# Altium PCB Motherboard.PcbDoc
Units mil, origin at the board's own origin, x right, y up, seen from the top; angles counter-clockwise.
Board outline 6000 x 4000 mil, 2 copper layers (Top Layer, Bottom Layer); 17 components, 24 nets, 94 pads, 0 vias.
Unrouted connection lines stored in the file: 45.
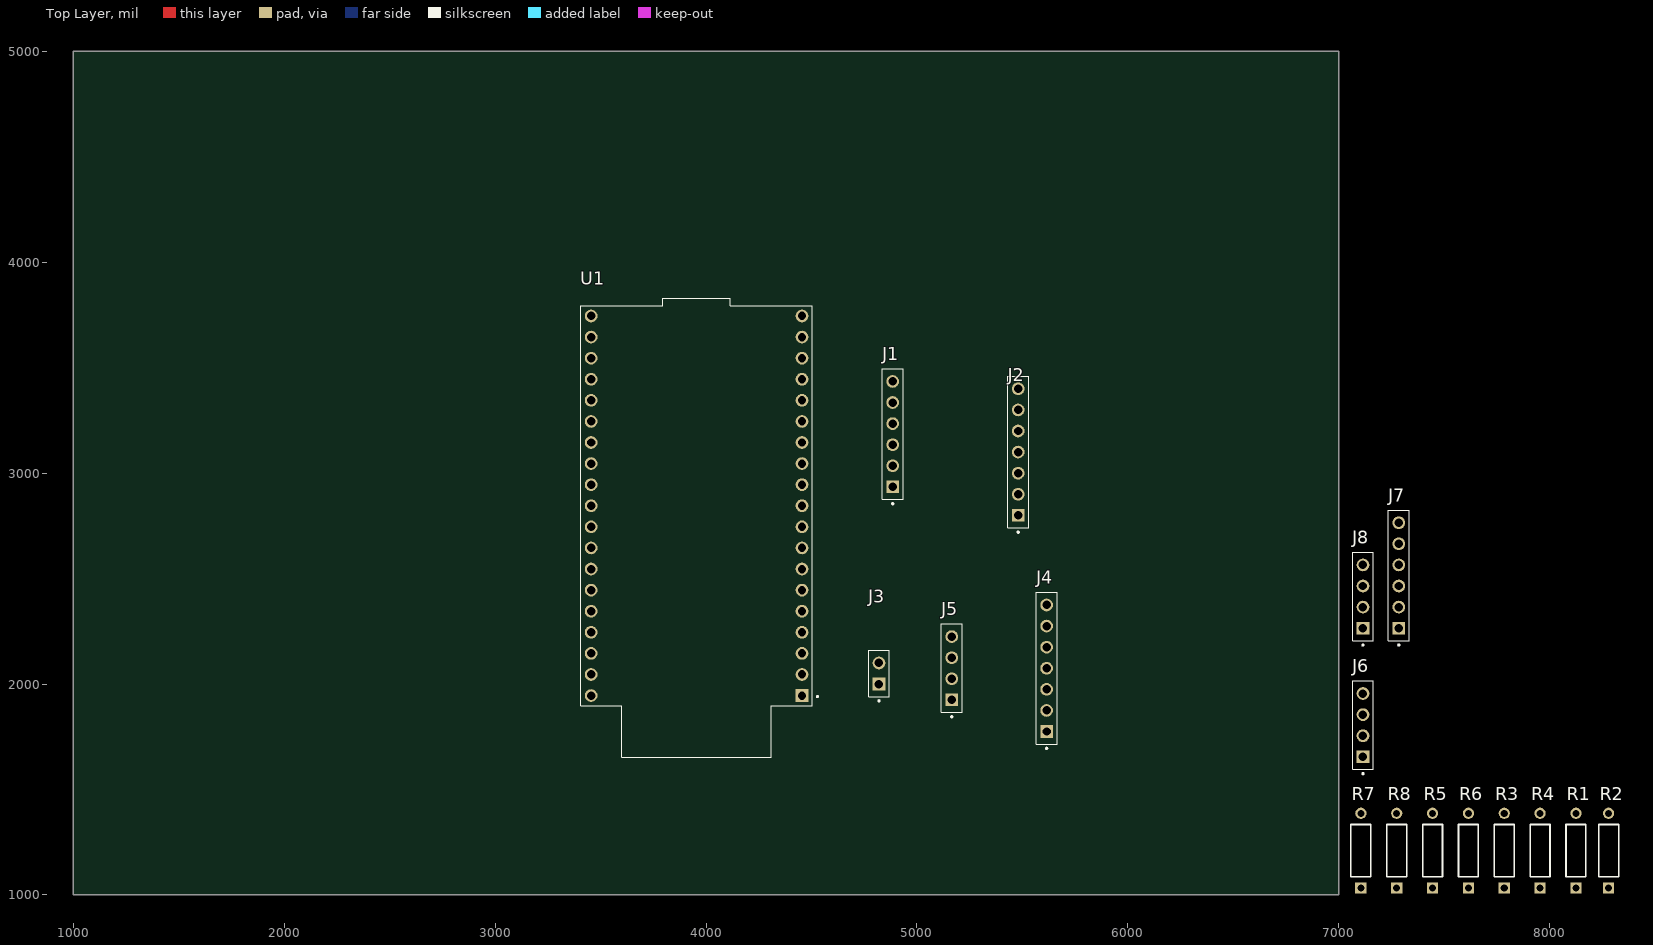
[diagram p0: Top Layer view]
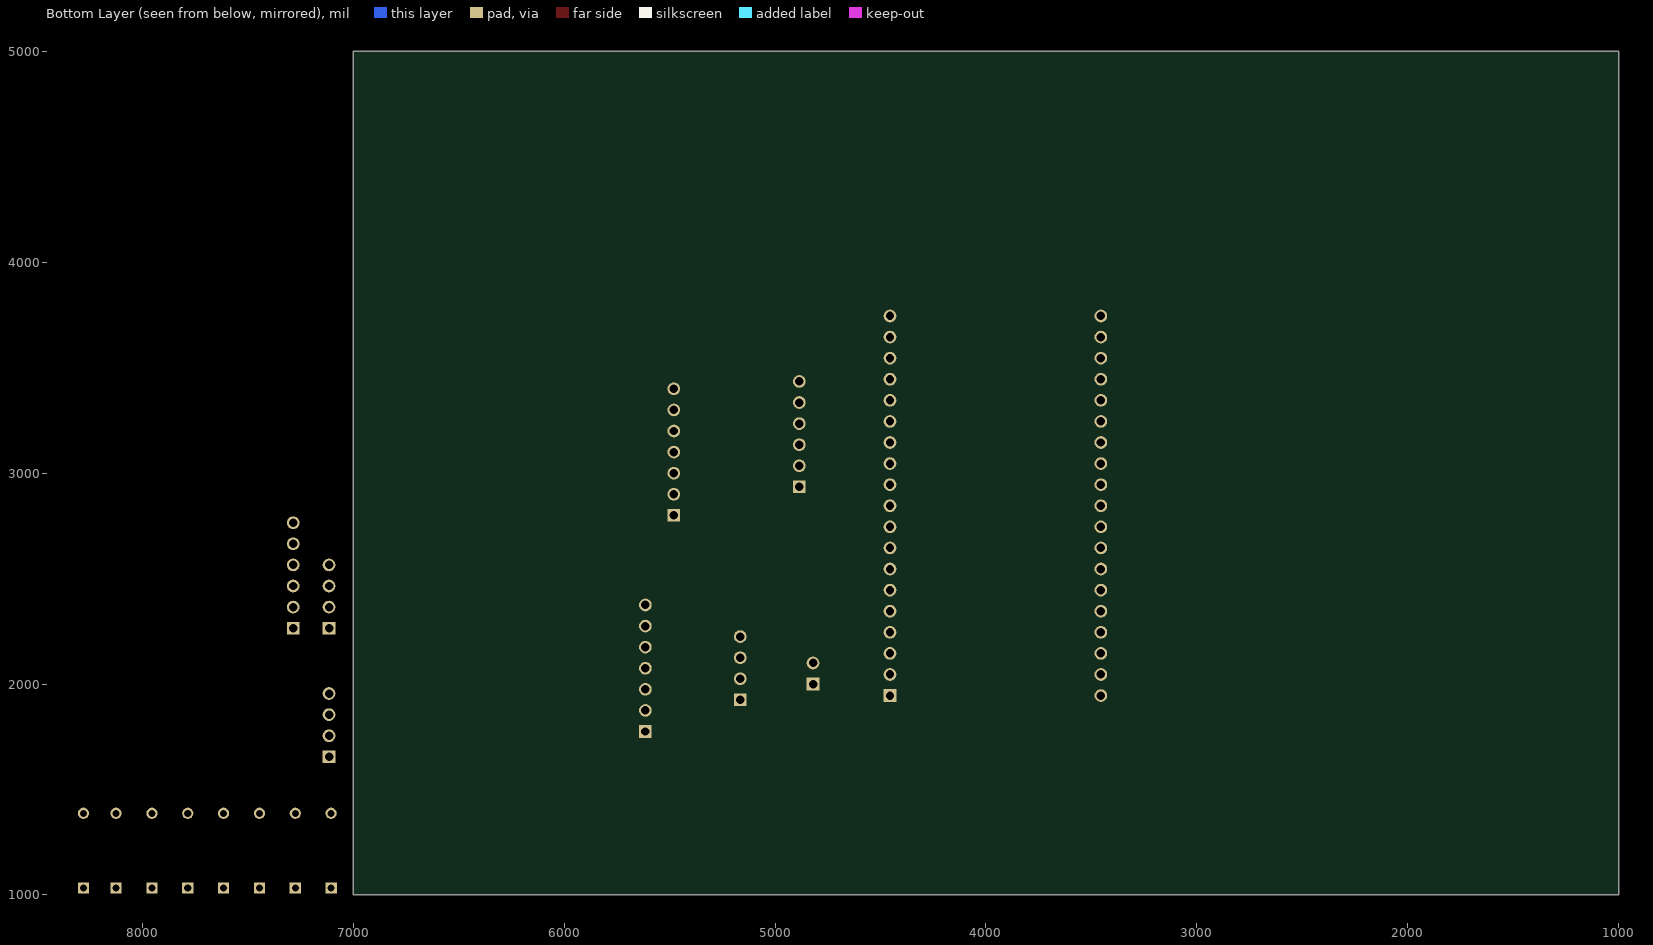
[diagram p1: Bottom Layer view, seen from below]

## Layer stack, top to bottom
Top Solder: solder mask 0.4, Solder Resist, Dk 3.5
Top Layer: signal copper 1.4
Dielectric 1: dielectric 12.6, FR-4, Dk 4.8
Bottom Layer: signal copper 1.4
Bottom Solder: solder mask 0.4, Solder Resist, Dk 3.5

## Board outline
1000,1000 7000,1000 7000,5000 1000,5000

## Design rules (kind name [scope] priority, off if disabled: settings)
Clearance [All] p1: gap=10 ignorepadtopadclearanceinfootprint=FALSE
PolygonConnect [All] p1: connectstyle=Relief reliefconductorwidth=10 reliefentries=4 polygonreliefangle="90 Angle" airgapwidth=10
RoutingVias [All] p1: holewidth=28 width=50 viastyle="Through Hole" minholewidth=28 minwidth=50 maxholewidth=28 maxwidth=50
SolderMaskExpansion [All] p1: expansion=0 istentingtop=FALSE
SupplyNets "Schematic Supply Nets_3" [InNet('+9V')] p1: voltage=0.000
SupplyNets "Schematic Supply Nets_2" [InNet('VCC')] p2: voltage=0.000
SupplyNets "Schematic Supply Nets" [InNet('GND')] p3: voltage=0.000
Width [All] p1: maxlimit=10 minlimit=10 preferedwidth=10
30 further rules are at their usual default settings.

## Classes and differential pairs
component class Inputs: J7 J8
component class "Button LED Power": R1 R2 R3 R4 R5 R6 R7 R8
component class Display: J4 J5 J6
component class DevKitESP32: U1
component class Audio: J1 J2 J3

## Components (designator, comment, footprint, x,y, rotation, side; value= is the part's Value field where it differs from the comment)
J1 "SSK02-FPH-254-A6" SAMESKY_SSK02-FPH-254-A6 4885,3185 r90 top
J2 "SSK02-FPH-254-A7" SAMESKY_SSK02-FPH-254-A7 5480,3100 r90 top
J3 "SSK02-FPH-254-A2" SAMESKY_SSK02-FPH-254-A2 4820,2050 r90 top
J4 "SSK02-FPH-254-A7" SAMESKY_SSK02-FPH-254-A7 5615,2075 r90 top
J5 "SSK02-FPH-254-A4" SAMESKY_SSK02-FPH-254-A4 5165,2075 r90 top
J6 "SSK02-FPH-254-A4" SAMESKY_SSK02-FPH-254-A4 7115,1805 r90 top
J7 "SSK02-FPH-254-A6" SAMESKY_SSK02-FPH-254-A6 7285,2515 r90 top
J8 "SSK02-FPH-254-A4" SAMESKY_SSK02-FPH-254-A4 7115,2415 r90 top
R1 "470" RESA60-630X240 8125,1210 r90 top
R2 "220" RESA60-630X240 8280,1210 r90 top
R3 "10K" RESA60-630X240 7785,1210 r90 top
R4 "10K" RESA60-630X240 7955,1210 r90 top
R5 "470" RESA60-630X240 7445,1210 r90 top
R6 "220" RESA60-630X240 7615,1210 r90 top
R7 "10K" RESA60-630X240 7105,1210 r90 top
R8 "10K" RESA60-630X240 7275,1210 r90 top
U1 "DEVKIT_V1_ESP32-WROOM-32" MODULE_DEVKIT_V1_ESP32-WROOM-32 3955,2845 r180 top

## Footprints (in the part's own frame and the unit in brackets; to place one, negate y for a bottom-side part, rotate by r counter-clockwise, add the part's x,y. Pads: shape width x height; smd on the part's side, far side on the other; paste and mask are expansions set on the pad)
MODULE_DEVKIT_V1_ESP32-WROOM-32 [mm]
  rect 1.53x1.53 / inner round 1.53 / far side rect 1.53x1.53 hole 1.02 mask+0.102: 1(-12.7,22.85)
  round 1.53 hole 1.02 mask+0.102: 2(-12.7,20.31) 3(-12.7,17.77) 4(-12.7,15.23) 5(-12.7,12.69) 6(-12.7,10.15) 7(-12.7,7.61) 8(-12.7,5.07) 9(-12.7,2.53) 10(-12.7,-0.01) 11(-12.7,-2.55) 12(-12.7,-5.09) 13(-12.7,-7.63) 14(-12.7,-10.17) 15(-12.7,-12.71) 16(-12.7,-15.25) 17(-12.7,-17.79) 18(-12.7,-20.33) 19(-12.7,-22.87) 20(12.7,-22.87) 21(12.7,-20.33) 22(12.7,-17.79) 23(12.7,-15.25) 24(12.7,-12.71) 25(12.7,-10.17) 26(12.7,-7.63) 27(12.7,-5.09) 28(12.7,-2.55) 29(12.7,-0.01) 30(12.7,2.53) 31(12.7,5.07) 32(12.7,7.61) 33(12.7,10.15) 34(12.7,12.69) 35(12.7,15.23) 36(12.7,17.77) 37(12.7,20.31) 38(12.7,22.85)
  silkscreen extent -14.67,-25 13.95,30.3, body extent -14.28,-25.88 14.28,25.48, height 6.69
RESA60-630X240 [mm] "Axial Resistor, 2-Leads, Dia 2.4mm, Body Length 6.3mm"
  rect 1.35x1.35 hole 0.85: 1(-4.5,0)
  round 1.35 hole 0.85: 2(4.5,0)
  silkscreen extent -3.15,-1.2 3.15,1.2, body extent -3.15,-1.2 3.15,1.2, height 2.4
SAMESKY_SSK02-FPH-254-A2 [mm]
  rect 1.53x1.53 / inner round 1.53 / far side rect 1.53x1.53 hole 1.02 mask+0.102: 1(-1.27,0)
  round 1.53 hole 1.02 mask+0.102: 2(1.27,0)
  silkscreen extent -3.4,-1.25 2.79,1.25
SAMESKY_SSK02-FPH-254-A4 [mm]
  rect 1.53x1.53 / inner round 1.53 / far side rect 1.53x1.53 hole 1.02 mask+0.102: 1(-3.81,0)
  round 1.53 hole 1.02 mask+0.102: 2(-1.27,0) 3(1.27,0) 4(3.81,0)
  silkscreen extent -5.94,-1.25 5.33,1.25
SAMESKY_SSK02-FPH-254-A6 [mm]
  rect 1.53x1.53 / inner round 1.53 / far side rect 1.53x1.53 hole 1.02 mask+0.102: 1(-6.35,0)
  round 1.53 hole 1.02 mask+0.102: 2(-3.81,0) 3(-1.27,0) 4(1.27,0) 5(3.81,0) 6(6.35,0)
  silkscreen extent -8.48,-1.25 7.87,1.25
SAMESKY_SSK02-FPH-254-A7 [mm]
  rect 1.53x1.53 / inner round 1.53 / far side rect 1.53x1.53 hole 1.02 mask+0.102: 1(-7.62,0)
  round 1.53 hole 1.02 mask+0.102: 2(-5.08,0) 3(-2.54,0) 4(0,0) 5(2.54,0) 6(5.08,0) 7(7.62,0)
  silkscreen extent -9.75,-1.25 9.14,1.25

## Part data
J1 J7: "6 Position Header Connector 0.100 (2.54mm) Through Hole Gold", Package=None, Check_prices=https://www.snapeda.com/parts/SSK02-FPH-254-A6/Same+Sky/view-part/?ref=eda, MF="Same Sky (Formerly CUI Devices)", MP=SSK02-FPH-254-A6, SnapEDA_Link=https://www.snapeda.com/parts/SSK02-FPH-254-A6/Same+Sky/view-part/?ref=snap
J2 J4: Package=None, Availability=Unavailable, MF="{'manufacturer': u'Same Sky (Formerly CUI Devices)'}", MP=SSK02-FPH-254-A7, Price=None
J3: "2 Position Header Connector 0.100 (2.54mm) Through Hole Gold", Package=None, Check_prices=https://www.snapeda.com/parts/SSK02-FPH-254-A2/Same+Sky/view-part/?ref=eda, MF="Same Sky (Formerly CUI Devices)", MP=SSK02-FPH-254-A2, SnapEDA_Link=https://www.snapeda.com/parts/SSK02-FPH-254-A2/Same+Sky/view-part/?ref=snap
J5 J6 J8: "4 Position Header Connector 0.100 (2.54mm) Through Hole Gold", Package=None, Check_prices=https://www.snapeda.com/parts/SSK02-FPH-254-A4/Same+Sky/view-part/?ref=eda, MF="Same Sky (Formerly CUI Devices)", MP=SSK02-FPH-254-A4, SnapEDA_Link=https://www.snapeda.com/parts/SSK02-FPH-254-A4/Same+Sky/view-part/?ref=snap
R1 R2 R3 R4 R5 R6 R7 R8: library part CMP-1659-00070-1, "Axial Resistor, 1 MOhm, +/- 1%, 250 mW, -55 to 155 degC, 2-Pin THD, RoHS, Bulk", Case\Package=Axial, Max Operating Temperature="155 degC", Min Operating Temperature="-55 degC", Package Quantity=200, Power Rating="250 mW", Resistance="47.5 kohm", Tolerance=1%, Voltage Rating="250 V", ComponentLink1Description="Manufacturer URL", ComponentLink1URL=http://www.yageo.com/, ComponentLink2Description=Datasheet, ComponentLink2URL=http://www.yageo.com/documents/recent/Yageo%20LR_MFR_2013.pdf, DatasheetVersion=Apr-13, Length="0.248 inch", Mount="Through Hole", PackageDescription="2-Pin Axial Lead, Dia 2.4 mm, Body Length 6.3 mm", PackageReference=MFR-25, Packaging=Bulk, RoHSCompliant=true
U1: "WROOM-32 Development Board ESP32 ESP-32S WiFi Bluetooth Dev Module", Package=Package, Check_prices=https://www.snapeda.com/parts/DEVKIT%20V1%20ESP32-WROOM-32/Espressif+Systems/view-part/?ref=eda, MF="Espressif Systems", MP="DEVKIT V1 ESP32-WROOM-32", SnapEDA_Link=https://www.snapeda.com/parts/DEVKIT%20V1%20ESP32-WROOM-32/Espressif+Systems/view-part/?ref=snap

## Nets (pads, with @x,y where several pads share a name; then routed paths per layer and width w, separated by ;. In a path a pad name is that pad's centre, name@x,y a point inside that pad or via, vN(x,y) a via of type N, cw(c..) or ccw(c..) an arc to the next point about the centre after c; other vN are vias at no path point)
+9V: R2.2 R6.2
AUDIO_DAC: J2.6 U1.9
GND: J1.6 J2.3 J2.5 J2.7 J4.1 J5.2 J5.4 J6.2 J6.4 J7.2 J7.4 J7.6 J8.2 R3.1 R4.1 R7.1 R8.1 U1.38
I2C_SCL: J8.3 U1.36
I2C_SDA: J8.4 U1.33
LED_GR_B: J6.1 R4.2
LED_GREEN: J5.1 U1.12
LED_PURGE_BUTTON: R5.1 U1.8
LED_RED: J5.3 U1.28
LED_RED_B: J6.3 R8.2
LED_START_BUTTON: R1.1 U1.7
OLED_CS: J4.7 U1.11
OLED_DC: J4.6 U1.10
OLED_RST: J4.5 U1.26
PURGE_BUTTON: J7.3 U1.6
SD_CS: J1.1 U1.15
SPEAKER_NEG: J2.1 J3.2
SPEAKER_POS: J2.2 J3.1
SPI_MISO: J1.4 U1.31
SPI_MOSI: J1.3 J4.4 U1.37
SPI_SCK: J1.2 J4.3 U1.30
START_BUTTON: J7.5 U1.27
TRAP_SWITCH: J7.1 U1.5
VCC: J1.5 J2.4 J4.2 J8.1 U1.1
pads on no net: R1.2 R2.1 R3.2 R5.2 R6.1 R7.2 U1.2 U1.3 U1.4 U1.13 U1.14 U1.16 U1.17 U1.18 U1.19 U1.20 U1.21 U1.22 U1.23 U1.24 U1.25 U1.29 U1.32 U1.34 U1.35